# Altium PCB LSS-P-PCB-T v3.5.PcbDoc (part 5 of 5)
Units mil, origin at the board's own origin, x right, y up, seen from the top; angles counter-clockwise.
Board outline 2795.28 x 2795.28 mil, 4 copper layers (Top Layer, Power, Ground, Bottom Layer), stack 62.08 mil thick; 167 components, 123 nets, 589 pads, 650 vias.
Unrouted connection lines stored in the file: 2.
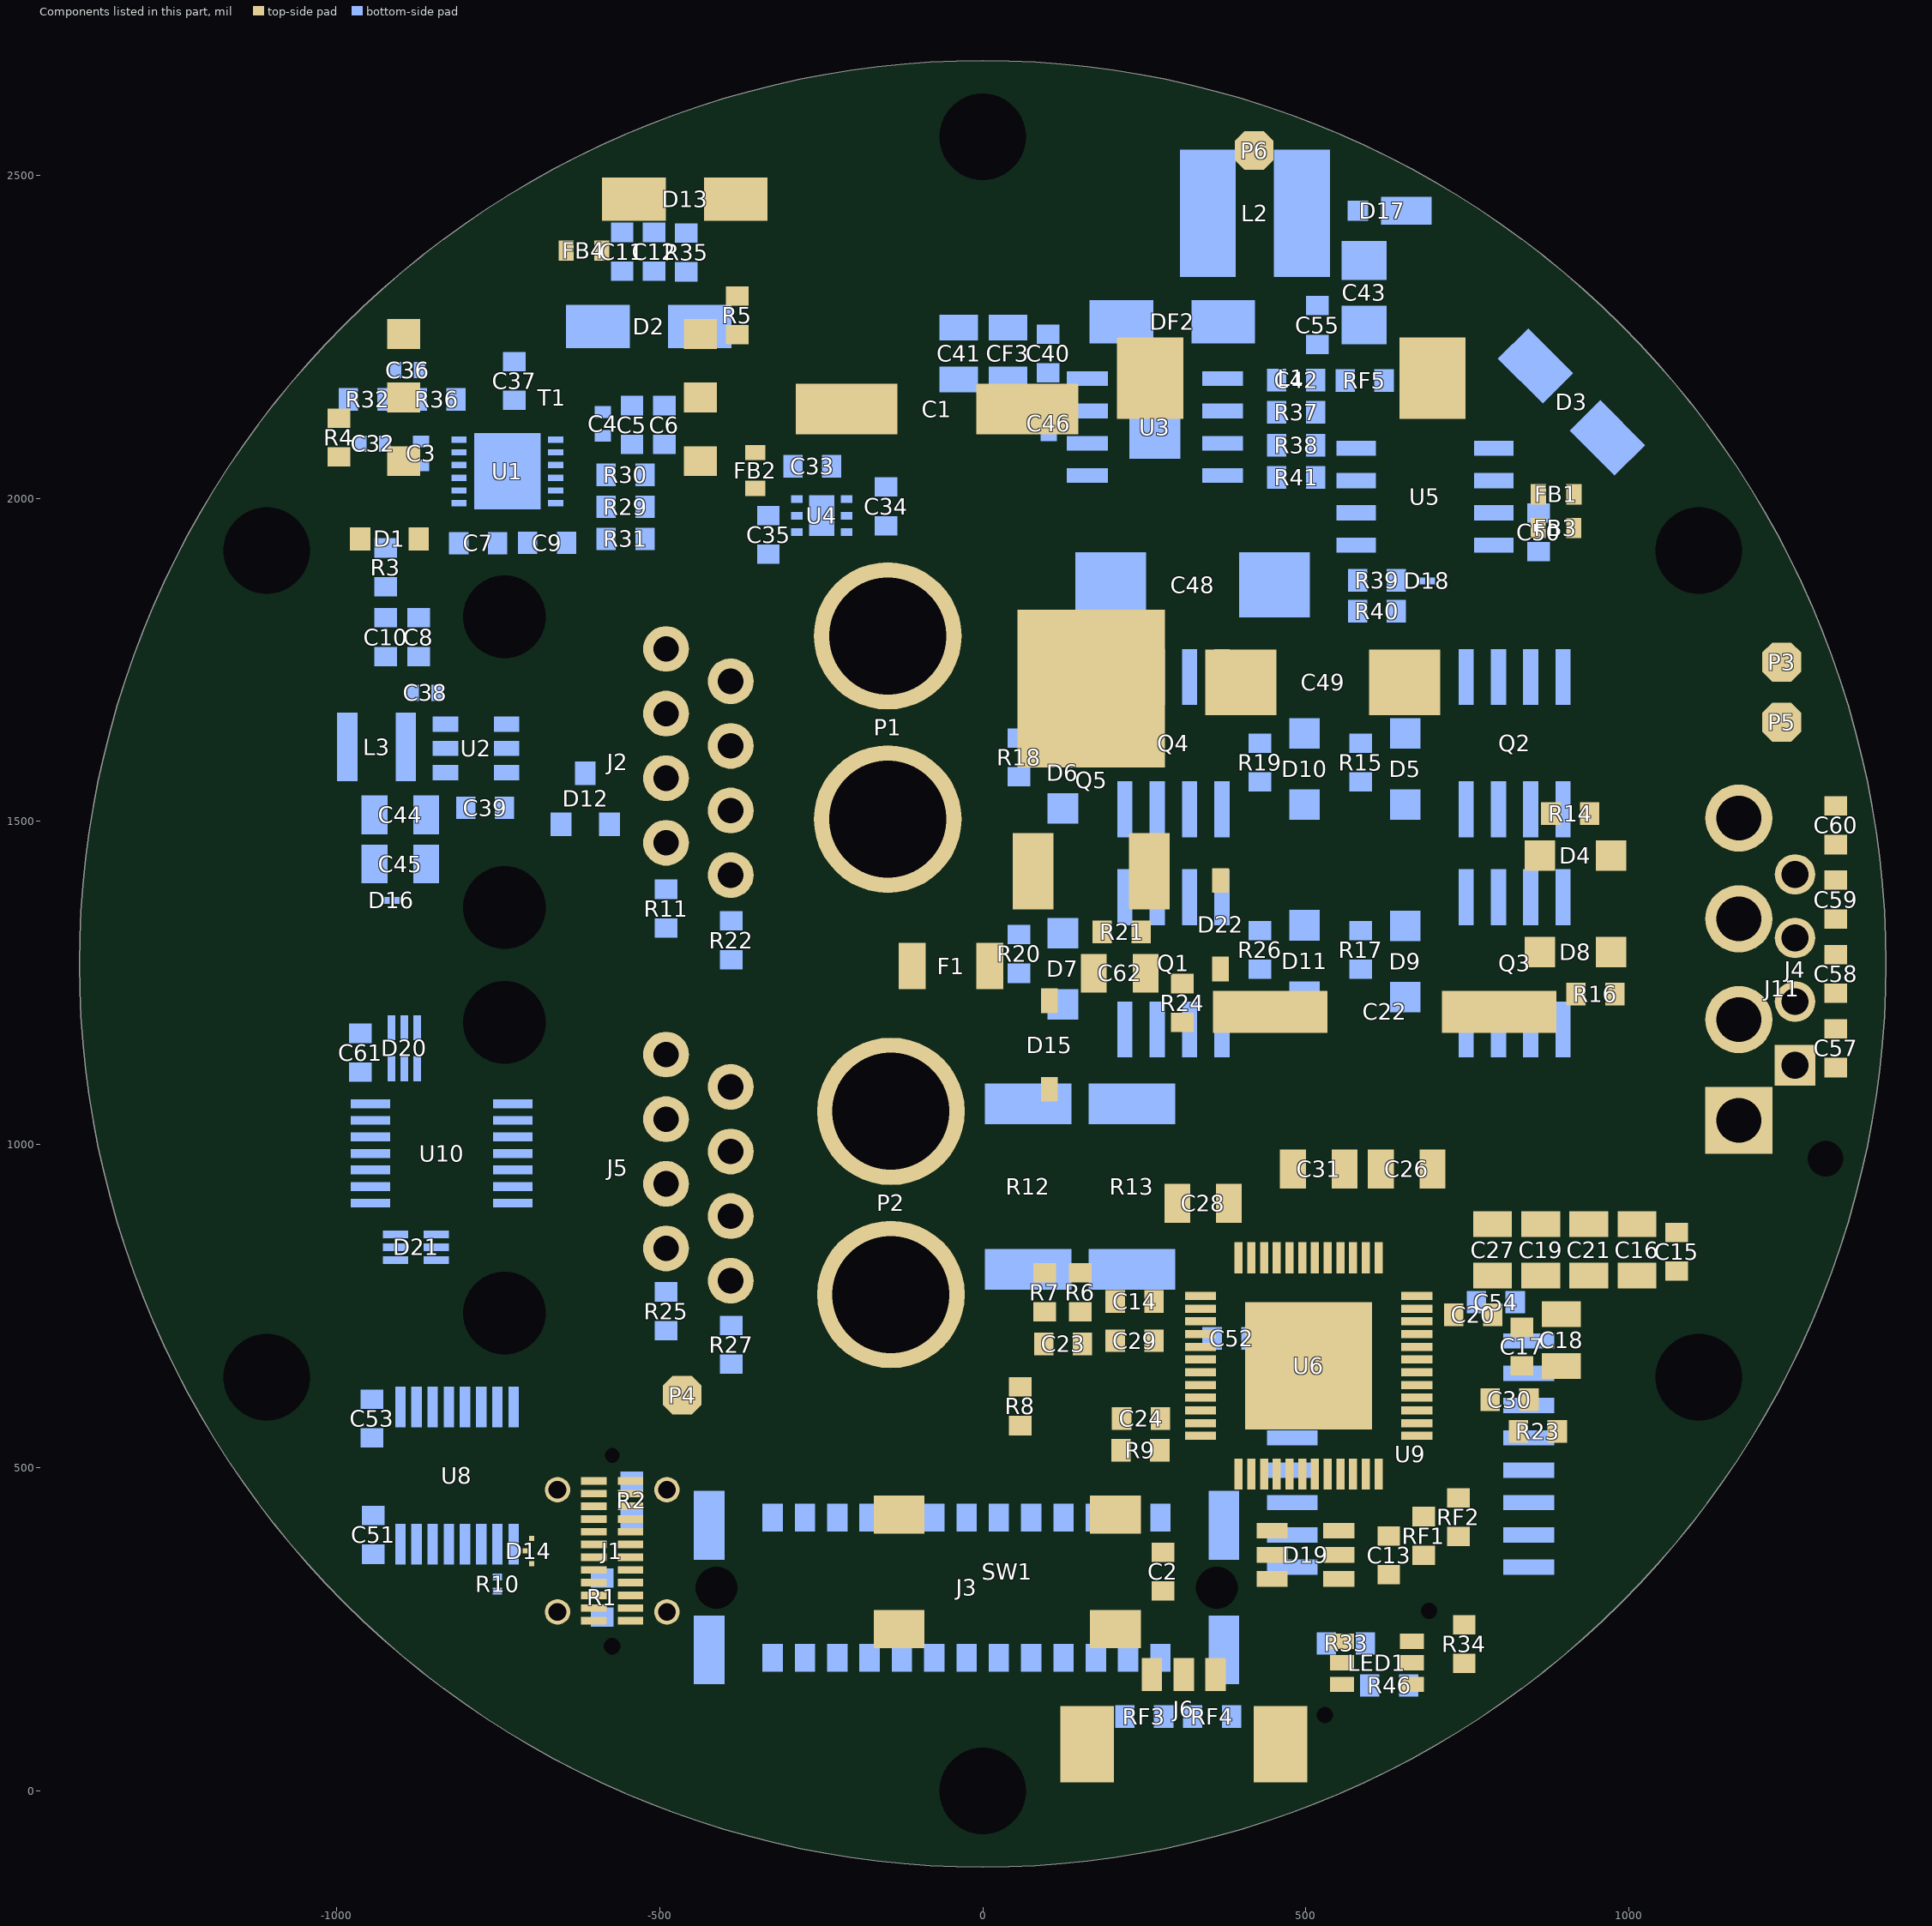
[diagram p5: the components of this part, seen from the top]

## Polygon pours and split planes (outlines as drawn)
GND on Bottom Layer "NONET_L-01_P-001" (solid, remove dead copper, pour order 6): -758,1077 -758,1054 -681,1054 -681,976 -644,976 -644,1077
GND on Bottom Layer "NONET_L-01_P-001" (solid, remove dead copper, pour order 2): 611.22,2496 685.23,2496 743,2459.31 743,2414.57 611.22,2415.47
VS### on Bottom Layer "NONET_L-01_P-001" (solid, remove dead copper, pour order 23): 26.62,1181 -1.97,1181 -33,1212.03 -33,1385.96 45.68,1464.64 180,1464.64 180,1367 32.97,1367 26.62,1360.65 26.62,1184
GND on Bottom Layer "GND_L04_P000" (solid, remove dead copper, pour order 0): -318,699.41 -243.35,626 -63.01,626 101.55,787 -318,787
12V on Bottom Layer "NONET_L-01_P-001" (solid, remove dead copper, pour order 3): 439,2570.78 530.85,2570.78 597,2541 597,2491.47 439,2491.47
VS### on Top Layer "NONET_L-01_P-001" (solid, remove dead copper, pour order 24): -10,1283 -10,1205 20,1175 138,1175 138,1282 137,1283 135,1283 137,1283 135,1283
VS### on Top Layer "NONET_L-01_P-001" (solid, remove dead copper, pour order 20): 223.41,1235 263,1235 263,1388.75 223.41,1388.75
GND on Top Layer "NONET_L-01_P-001" (solid, remove dead copper, pour order 18): 356.38,1204 356.38,1237.85 390.71,1237.85 390.71,1294.29 377,1308 324,1308 324,1437 430,1437 430,1325.25 467.25,1288 533.55,1288 533.55,1161.55 510,1138 356.5,1138 320.5,1174 290.5,1174 290.5,1204
VS on Top Layer "NONET_L-01_P-001" (solid, remove dead copper, pour order 13): 36,1634 36,1523 341,1523 341,1634
VS### on Top Layer "NONET_L-01_P-001" (solid, remove dead copper, pour order 15): 131,1481.62 131,1382.72 300,1382.72 300,1481.62
NetC62_1 on Top Layer "NONET_L-01_P-001" (solid, remove dead copper, pour order 16): 36,1340.5 118,1340.5 118,1481.72 36,1481.72
NetC62_1 on Top Layer "NONET_L-01_P-001" (solid, remove dead copper, pour order 12): 152,1211 209.84,1211 209.84,1327.14 152,1327.14
NetC62_1 on Top Layer "NONET_L-01_P-001" (solid, remove dead copper, pour order 14): 79,1371 79,1310 210,1310 210,1371
NetC62_1 on Top Layer "NONET_L-01_P-001" (solid, remove dead copper, pour order 10): 288,1291 288,1245 381,1245 381,1291
12V on Top Layer "NONET_L-01_P-001" (solid, remove dead copper, pour order 9): 461.22,2570.78 530.85,2570.78 599,2540.1 599,2481 461.22,2481
GND on Top Layer "NONET_L-01_P-001" (solid, remove dead copper, pour order 5): 614,2496 685.23,2496 743,2459.31 743,2415.45 614,2415.45
ISO_GND on Ground (split plane): 159 vertices, not listed, extent -949.93,109.07 1028.93,2481.39
GND on Ground (split plane): 101.37,2653.75 168.68,2647.12 235.58,2637.2 301.91,2624 367.52,2607.57 432.24,2587.94 495.92,2565.15 558.4,2539.27 619.54,2510.35 679.19,2478.47 737.2,2443.7 793.44,2406.12 847.76,2365.83 900.04,2322.93 950.16,2277.51 997.98,2229.68 1043.4,2179.57 1086.31,2127.29 1126.6,2072.97 1164.17,2016.73 1198.94,1958.72 1230.82,1899.07 1259.74,1837.93 1285.62,1775.45 1308.41,1711.77 1328.04,1647.05 1344.47,1581.44 1357.67,1515.11 1367.59,1448.2 1374.22,1380.9 1377.54,1313.34 1377.54,1279.53 1377.54,1245.71 1374.22,1178.16 1367.59,1110.85 1357.67,1043.95 1344.47,977.62 1328.04,912.01 1308.41,847.29 1285.62,783.61 1259.74,721.12 1230.82,659.98 1198.94,600.34 1164.17,542.33 1126.6,486.09 1086.31,431.77 1043.4,379.48 997.98,329.37 950.16,281.55 900.04,236.13 847.76,193.22 793.44,152.93 737.2,115.36 679.19,80.59 619.54,48.7 558.4,19.79 495.92,-6.1 432.24,-28.88 367.52,-48.51 301.91,-64.95 235.58,-78.14 168.68,-88.07 101.37,-94.69 33.82,-98.01 -33.82,-98.01 -101.37,-94.69 -168.68,-88.07 -235.58,-78.14 -301.91,-64.95 -367.52,-48.51 -432.24,-28.88 -495.92,-6.1 -558.4,19.79 -619.54,48.7 -679.19,80.59 -737.2,115.36 -793.44,152.93 -847.76,193.22 -900.04,236.13 -950.16,281.55 -997.98,329.37 -1043.4,379.48 -1086.31,431.77 -1126.6,486.09 -1164.17,542.33 -1198.94,600.34 -1230.82,659.98 -1259.74,721.12 -1285.62,783.61 -1308.41,847.29 -1328.04,912.01 -1344.47,977.62 -1357.67,1043.95 -1367.59,1110.85 -1374.22,1178.16 -1377.54,1245.71 -1377.54,1279.53 -1377.54,1313.34 -1374.22,1380.9 -1367.59,1448.2 -1357.67,1515.11 -1344.47,1581.44 -1328.04,1647.05 -1308.41,1711.77 -1285.62,1775.45 -1259.74,1837.93 -1230.82,1899.07 -1198.94,1958.72 -1164.17,2016.73 -1126.6,2072.97 -1086.31,2127.29 -1043.4,2179.57 -997.98,2229.68 -950.16,2277.51 -900.04,2322.93 -847.76,2365.83 -793.44,2406.12 -737.2,2443.7 -679.19,2478.47 -619.54,2510.35 -558.4,2539.27 -495.92,2565.15 -432.24,2587.94 -367.52,2607.57 -301.91,2624 -235.58,2637.2 -168.68,2647.12 -101.37,2653.75 -33.82,2657.07 33.82,2657.07
5V on Power (split plane): 179 vertices, not listed, extent -1377.54,141.07 -155.07,2648.46
VDD_3V3 on Power (split plane): -373.07,832.07 -522,832.07 -524.94,831.78 -527.77,830.93 -530.37,829.53 -532.66,827.66 -534.53,825.37 -535.93,822.77 -536.78,819.94 -537.07,817 -537.07,565 -537.07,447 -536.78,444.06 -535.93,441.23 -534.53,438.63 -532.66,436.34 -530.37,434.47 -527.77,433.07 -524.94,432.22 -522,431.93 516.93,431.93 516.93,343 517.22,340.06 518.07,337.23 519.47,334.63 521.34,332.34 564.16,289.52 566.45,287.64 569.05,286.25 571.88,285.39 574.82,285.1 701.52,285.1 704.13,284.86 954.35,285.74 950.16,281.55 900.04,236.13 847.76,193.22 793.44,152.93 737.2,115.36 679.19,80.59 619.54,48.7 558.4,19.79 495.92,-6.1 432.24,-28.88 426.07,-30.75 426.07,39 425.78,41.94 424.93,44.77 423.53,47.37 421.66,49.66 419.37,51.53 416.77,52.93 413.94,53.78 411,54.07 179.24,54.07 103.66,129.66 101.37,131.53 98.77,132.93 95.94,133.78 93,134.07 -172,134.07 -174.94,133.78 -177.77,132.93 -180.37,131.53 -182.66,129.66 -184.53,127.37 -185.93,124.77 -186.78,121.94 -187.07,119 -187.07,60 -187.07,-33.91 -186.78,-36.85 -185.93,-39.68 -184.53,-42.28 -182.66,-44.57 -180.37,-46.44 -177.77,-47.83 -174.94,-48.69 -172,-48.98 365.65,-48.98 301.91,-64.95 235.58,-78.14 168.68,-88.07 101.37,-94.69 33.82,-98.01 -33.82,-98.01 -101.37,-94.69 -168.68,-88.07 -235.58,-78.14 -301.91,-64.95 -367.52,-48.51 -432.24,-28.88 -495.92,-6.1 -558.4,19.79 -619.54,48.7 -679.19,80.59 -729.81,110.93 -322.76,110.93 -319.82,111.22 -316.99,112.07 -314.39,113.47 -312.1,115.34 -310.23,117.63 -308.83,120.23 -307.98,123.06 -307.69,126 -307.69,260 -307.98,262.94 -308.83,265.77 -310.23,268.37 -312.1,270.66 -314.39,272.53 -316.99,273.93 -319.82,274.78 -322.76,275.07 -756.76,275.07 -921.93,440.24 -921.93,975.7 -922.22,978.64 -923.07,981.47 -924.47,984.08 -926.34,986.36 -928.63,988.23 -931.23,989.63 -934.06,990.49 -937,990.77 -998.93,990.77 -998.93,1261.93 -611,1261.93 -608.06,1262.22 -605.23,1263.07 -602.63,1264.47 -600.34,1266.34 -598.47,1268.63 -597.07,1271.23 -596.22,1274.06 -595.93,1277 -595.93,1732.76 -524.52,1804.17 -522.64,1806.45 -521.25,1809.06 -520.39,1811.89 -520.1,1814.83 -520.1,1868.93 -373.07,1868.93
VCC_3V3_M on Power (split plane): 1164.17,2016.73 1198.94,1958.72 1230.82,1899.07 1259.74,1837.93 1285.62,1775.45 1308.41,1711.77 1328.04,1647.05 1344.47,1581.44 1357.67,1515.11 1367.59,1448.2 1374.22,1380.9 1377.54,1313.34 1377.54,1279.53 1377.54,1245.71 1374.22,1178.16 1367.59,1110.85 1357.67,1043.95 1344.47,977.62 1328.04,912.01 1308.41,847.29 1285.62,783.61 1259.74,721.12 1230.82,659.98 1198.94,600.34 1164.17,542.33 1126.6,486.09 1086.31,431.77 1043.4,379.48 997.98,329.37 984.6,315.99 774.64,315.25 581.07,315.25 547.07,349.24 547.07,447 546.78,449.94 545.93,452.77 544.53,455.37 542.66,457.66 540.37,459.53 537.77,460.93 534.94,461.78 532,462.07 -506.93,462.07 -506.93,549.93 -39.56,549.93 -36.62,550.22 -33.79,551.07 -31.18,552.47 -28.9,554.34 17.69,600.93 727.76,600.93 821.34,507.34 823.63,505.47 826.23,504.07 829.06,503.22 832,502.93 979.3,502.93 980.73,503.07 982.15,503.2 982.2,503.21 982.24,503.22 983.61,503.63 984.98,504.04 985.02,504.06 985.07,504.07 986.33,504.75 987.6,505.42 987.63,505.45 987.67,505.47 988.78,506.38 989.89,507.28 989.92,507.31 989.96,507.34 990.87,508.45 991.78,509.55 991.8,509.59 991.83,509.63 992.51,510.89 993.19,512.15 993.2,512.19 993.23,512.23 993.64,513.6 994.06,514.97 994.07,515.02 994.08,515.06 994.22,516.49 994.37,517.91 995.39,685.91 995.38,685.95 995.39,686 995.25,687.42 995.11,688.85 995.1,688.9 995.1,688.94 995.07,689.02 995.07,973.93 1063,973.93 1065.94,974.22 1068.77,975.07 1071.37,976.47 1073.66,978.34 1075.53,980.63 1076.93,983.23 1077.78,986.06 1078.07,989 1078.07,1106.93 1220.32,1106.93 1223.26,1107.22 1226.09,1108.07 1228.69,1109.47 1230.98,1111.34 1232.85,1113.63 1234.24,1116.23 1235.1,1119.06 1235.39,1122 1235.39,1548.68 1235.1,1551.62 1234.24,1554.45 1232.85,1557.06 1230.98,1559.34 1131.16,1659.16 1130.14,1660 1129.3,1661.02 1127.02,1662.89 1124.41,1664.28 1121.58,1665.14 1118.64,1665.43 1004.07,1665.43 1004.07,1738 1003.78,1740.94 1002.93,1743.77 1001.53,1746.37 999.66,1748.66 905.66,1842.66 783.67,1964.65 783.67,2058.93 1135.98,2058.93
3V3 on Power (split plane): -550.25,1821.07 -621.66,1749.66 -623.53,1747.37 -624.93,1744.77 -625.78,1741.94 -626.07,1739 -626.07,1292.07 -998.93,1292.07 -998.93,1698.29 -828.29,1868.93 -698,1868.93 -550.25,1868.93
3V8 on Power (split plane): -155.07,2067.07 -682.93,2067.07 -682.93,2331.76 -638.76,2375.93 -155.07,2375.93
VOUT_5V on Power (split plane): 830.63,675.34 832.91,673.47 835.52,672.07 838.34,671.22 841.29,670.93 965.15,670.93 964.32,533.07 838.24,533.07 744.66,626.66 742.37,628.53 739.77,629.93 736.94,630.78 734,631.07 11.44,631.07 8.5,630.78 5.68,629.93 3.07,628.53 0.79,626.66 -45.8,580.07 -506.93,580.07 -506.93,801.93 704.04,801.93
VCC_12V on Power (split plane): 105.93,1140.4 106.22,1137.46 107.07,1134.63 108.47,1132.03 110.34,1129.74 260.93,979.16 260.93,832.07 -3.93,832.07 -3.93,1072.6 -4.22,1075.54 -5.07,1078.37 -6.47,1080.98 -8.34,1083.26 -71.93,1146.85 -71.93,1275.9 -8.34,1339.49 -6.47,1341.77 -5.07,1344.38 -4.22,1347.2 -3.93,1350.14 -3.93,1799.08 -4.22,1802.02 -5.07,1804.85 -6.47,1807.46 -8.34,1809.74 -93.26,1894.66 -95.54,1896.53 -98.15,1897.93 -100.98,1898.78 -103.92,1899.07 -358,1899.07 -535.17,1899.07 -682.93,1899.07 -682.93,2036.93 105.93,2036.93
LED_R on Power (split plane): 162.34,28.34 164.63,26.47 167.23,25.07 170.06,24.22 173,23.93 395.93,23.93 395.93,-18.84 -156.93,-18.84 -156.93,60 -156.93,103.93 86.76,103.93
30VDC on Power (split plane): -34.07,1792.84 -34.07,1356.39 -97.66,1292.8 -99.53,1290.52 -100.93,1287.91 -101.78,1285.08 -102.07,1282.14 -102.07,1140.6 -101.78,1137.66 -100.93,1134.84 -99.53,1132.23 -97.66,1129.95 -34.07,1066.36 -34.07,832.07 -342.93,832.07 -342.93,1868.93 -110.16,1868.93
LED_B on Power (split plane): 304.34,250.34 306.63,248.47 309.23,247.07 312.06,246.22 315,245.93 499.93,245.93 499.93,206.07 -7.93,206.07 -7.93,296.93 257.76,296.93
VS on Power (split plane): 427.93,2074 428.22,2071.06 429.07,2068.23 430.47,2065.63 432.34,2063.34 434.63,2061.47 437.23,2060.07 440.06,2059.22 443,2058.93 753.52,2058.93 753.52,1958.41 753.81,1955.46 754.67,1952.64 756.06,1950.03 757.94,1947.75 884.34,1821.34 973.93,1731.76 973.93,1665.43 338.36,1665.43 335.42,1665.14 332.59,1664.28 329.98,1662.89 327.7,1661.02 239.34,1572.66 237.47,1570.37 236.07,1567.77 235.22,1564.94 234.93,1562 234.93,1231 235.22,1228.06 236.07,1225.23 237.47,1222.63 239.34,1220.34 316.34,1143.34 318.63,1141.47 321.23,1140.07 324.06,1139.22 327,1138.93 1047.93,1138.93 1047.93,1122 1048.22,1119.06 1048.69,1117.5 1048.22,1115.94 1047.93,1113 1047.93,1004.07 980,1004.07 977.06,1003.78 974.23,1002.93 971.63,1001.53 969.34,999.66 967.47,997.37 966.07,994.77 965.22,991.94 964.93,989 964.93,701.07 847.53,701.07 720.94,827.66 718.66,829.53 716.05,830.93 713.23,831.78 710.29,832.07 291.07,832.07 291.07,985.4 290.78,988.34 289.93,991.17 288.53,993.78 286.66,996.06 136.07,1146.64 136.07,2052 135.78,2054.94 134.93,2057.77 133.53,2060.37 131.66,2062.66 129.37,2064.53 126.77,2065.93 123.94,2066.78 121,2067.07 -124.93,2067.07 -124.93,2235.93 427.93,2235.93
MB2 on Power (split plane): 1047.93,1292.76 1047.93,1178.55 1047.93,1169.07 333.24,1169.07 265.07,1237.24 265.07,1416.93 923.76,1416.93
VOUT on Power (split plane): 101.37,2653.75 168.68,2647.12 235.58,2637.2 301.91,2624 367.52,2607.57 427.93,2589.24 427.93,2266.07 -124.93,2266.07 -124.93,2651.43 -101.37,2653.75 -33.82,2657.07 33.82,2657.07
MB1 on Power (split plane): 1205.25,1542.44 1205.25,1137.07 1078.07,1137.07 1078.07,1178.55 1078.07,1299 1077.78,1301.94 1076.93,1304.77 1075.53,1307.37 1073.66,1309.66 940.66,1442.66 938.37,1444.53 935.77,1445.93 932.94,1446.78 930,1447.07 265.07,1447.07 265.07,1555.76 344.6,1635.29 1112.4,1635.29
12V on Power (split plane): 495.92,2565.15 558.4,2539.27 619.54,2510.35 679.19,2478.47 737.2,2443.7 793.44,2406.12 847.76,2365.83 900.04,2322.93 950.16,2277.51 997.98,2229.68 1043.4,2179.57 1086.31,2127.29 1114.65,2089.07 458.07,2089.07 458.07,2578.69

## Other copper
Top Layer:
  rectangle net VS###: -10.71,1205 34,1311.83
  rectangle net ISO_GND: -718,363.93 -698,378.93
  region net VDD_3V3: -808,2349.8 -746.54,2306.76 -685.97,2393.26 -747.43,2436.3
  region net VDD_3V3: -747.43,2436.3 -713.51,2377.55 -610.32,2437.13 -644.24,2495.88
  region net VDD_3V3: -490.53,2496.46 -644.24,2496.46 -644.24,2419.11 -490.53,2419.11
  rectangle net VDD_3V3: -808,2199.74 -725,2349.8
  rectangle net 3V3_M: 789,1902 887.13,1977
  region net NetC62_1: 338,1211 338,1227 192,1227 192,1211
  rectangle net NetC62_1: 284,1220 338,1291
  rectangle net VS###: 224,1349 303,1482
  region net VS: 834,1202 834,1024 1050,1024 1050,1202
  rectangle net VS: 612,1150 873,1237.85
  rectangle net VS: 828,1024 879,1237.85
  region net VS: 612,1290 612,1205.37 814,1205.37 814,1290
  rectangle net ISO_GND: -463,2382 -269,2506
  region net VDD_3V3: -689.66,2450 -689.66,2367.25 -622.13,2367.25 -622.13,2450
  rectangle net 3V3: -606,2202 -544,2401.44
  region net VDD_3V3: -621.99,2411 -718,2411 -718,2364.5 -621.99,2364.5
  rectangle net ISO_GND: -628.86,473.09 -599.69,516.37
  region net ISO_GND: -596.51,268.91 -625.69,268.91 -625.69,225.63 -596.51,225.63
  region net ISO_GND: -517.82,268.91 -547,268.91 -547,225.63 -517.82,225.63
  rectangle net ISO_GND: -622,473 -525,491
  region net 3V3_M: 292,2045 292,1902 620,1902 620,2045
  region net VS: 650,1410 456,1410 456,1362 650,1362
  region net VS: 650,1150 650,1410 612,1410 612,1150
  region net VS: 582,1373 582,1565 456,1565 456,1373
  rectangle net GND: -318,698 -1,882.06
  rectangle net 30VDC: -318,915 -15.5,1133.5
  region net VS: 582,1639 272,1639 272,1523 582,1523
  region net 12V: 610,2100 610,2320 547,2320 547,2100
  rectangle net 12V: 540.74,2100 598,2416
  rectangle net NetD2_2: -530,2063 -408,2116
  rectangle net GND: 393.74,559.95 431,755.8
  region net NetD3_1: 833,2109 942.98,2218.98 894.05,2267.91 784.07,2157.93
  region net 12V: 1027.38,2092.64 1073.49,2134.15 998.68,2217.22 952.58,2175.71
  region net VS: 213.58,1787 213.58,2037 49.21,2037 49.21,1787
  region net 3V3_M: 455.37,1664 455.37,1785 293,1785 293,1664
  region net 3V3_M: 347.98,1664 347.98,2223.54 293,2223.54 293,1664
  region net VS: 182.66,1524.47 182.66,2103 36,2103 36,1524.47
  rectangle net NetD8_1: 895,1210 937,1270
  region net 12V: 599,2539 461,2539 461,2359 599,2359
  rectangle net VCC_12V: 245,721.3 320,732.3
  rectangle net HA2: 646,759.64 692,807
  rectangle net VS: 1030,772 1091.5,823
  rectangle net VOUT: 208,2308 346,2541
  rectangle net MOSI#: 527.09,315.39 586,341
  rectangle net TMC_1#: 656,409.37 699.79,442.61
  rectangle net GND: 593.74,466.03 631,757
  rectangle net TMC_2#: 707,419 753.79,471.37
  region net GND: 40,1157 40,1026.05 144,1026.05 144,1157
  rectangle net VCC_3V3_M: 660,325 753.79,402
  rectangle net VCC_3V3_M: 610.79,359 753.79,402.37
  rectangle net VCC_12V: 433,1842 963,1894
  rectangle net 3V3_M: 291.8,1984 362,2182.97
  rectangle net SW: -921.71,2030 -798,2125
  region net 30VDC: -59,1106 -59,1626 -318,1626 -318,1106
  region net VCC_3V3_M: 986,1902 986,1977 902,1977 902,1902
  region net VCC_12V: 1022,1709 1084.5,1771.5 962.5,1893.5 900,1831
  rectangle net VCC_12V: 245,722.3 285.31,761
  rectangle net MA2: 1062,1026 1109,1369
  rectangle net MB2: 1062,1376 1109,1573
  rectangle net SW: -834,2056 -798,2125
  rectangle net GND: -318,2090 -131,2292
  region net NetD2_2: -408.06,2034.23 -408.06,2106 -453.06,2106 -453.06,2034.23
  rectangle net VC: 453,2174 525.35,2256
  region net MA1: 1049,1585 826,1585 826,1550 1049,1550
  rectangle net GND: 832,850 1091,909
  region net VCC_3V3_M: 753.79,408.37 715.29,408.37 715.29,373 753.79,373
  rectangle net 3V3_M: 613.87,1902 821,1960
  region net 12V: 956.09,2025.93 1071.59,2133.64 1029.61,2178.66 914.11,2070.95
  region net 12V: 946.97,2080.6 1042.11,2166.27 997.62,2215.68 902.48,2130.01
  region net 12V: 974,1988.5 974,2130 902.44,2130 902.44,1988.5
  rectangle net VCC_12V: 789.26,1988 887,2089
  rectangle net MA1: 661,984 1221,1017
  region net ISO_GND: -463,2329 -463,2292 -362,2292 -362,2329
  region net ISO_GND: -463,2423 -463,2300 -418,2300 -418,2423
  region net HA2: 685,1641.75 685,1618.75 1166,1618.75 1166,1641.75
  rectangle net ISO_GND: 295,136 337,224.26
  rectangle net ISO_GND: -622,244 -525,269
  rectangle net GND: 308,515 362,575
  region net MA2: 767,1369 767,1336 1077.5,1336 1077.5,1369
  rectangle net SRAH: 525,1026 819,1078
  rectangle net MA1: 1262.79,1092 1347,1154
  rectangle net MB2: 1119,1434 1340,1484
  rectangle net MB1: 1154,1319 1340,1369
  rectangle net MA2: 1077,1142 1192,1263
  rectangle net MA2: 1106,1202 1345,1263
  region net MB2: 710.81,1415 710.81,1376 1107,1376 1107,1415
  rectangle net 3V3_M: 340,2170 421,2293
  rectangle net HA2: 598,1572 735,1642
  rectangle net BUTTON: 57,221 244,265
  rectangle net BUTTON: 164.95,250.78 244.69,297.78
  rectangle net MB2: 669,1299 772,1329
  rectangle net LA1: 946,1210 1050,1326
  region net NetD8_1: 831,1326 831,1247 937,1247 937,1326
  rectangle net HA1: 916,1423 1048,1480
  region net HA1: 1048,1540 913,1540 913,1422 1048,1422
  rectangle net NetD4_1: 826,1422 900,1540
  rectangle net GND: -740,2105 -600.21,2181
  rectangle net VCC_12V: -506,2012 -472,2047
  rectangle net VCC##: -971,1954 -930,2195
  rectangle net NetR32_1: -922,2228 -825,2283
  rectangle net VCC#: -909,1904.01 -803,2020.18
  rectangle net VCC_12V: 868,1862 938,1887
  rectangle net VCC#: -909,1904 -838,1969
  region net VCC_12V: 993,1709 1031,1747 890,1888 852,1850
  region net VCC_12V: 1269,1786 992.5,1786 992.5,1709 1269,1709
  region net GND: 939,583.05 939,634.05 828.45,634.05 828.45,583.05
  rectangle net GND: 864,584 939,680
  region net MA1: 749,1611 749,1571 1049,1571 1049,1611
  region net VCC##: -918.15,1787 -918.15,1994 -981,1994 -981,1787
  rectangle net 3V8: -355,2058.75 -329,2353
  rectangle net 3V8: -389,2055 -329,2191
  rectangle net NetD2_2: -530,2065 -471,2315
  rectangle net 30VDC: -268,1424 11,1626
  rectangle net 12V: 515,2100 595,2159
  rectangle net 12V: 439,2267 598,2372
  region net NetD3_1: 761.4,2073.22 908.94,2220.76 817.89,2311.82 670.35,2164.27
  region net NetD3_1: 841.5,2357.5 794.61,2310.61 914.61,2190.61 961.5,2237.5
  rectangle net NetD3_1: 637,1969 768,2248.99
  rectangle net 12V: 589,2318 709,2403
  region net 12V: 439,2482 439,2318 598,2318 598,2482
  region net VOUT: 423,2308 423,2482 242,2482 242,2308
  rectangle net 3V3_M: 207.81,2123.01 348,2293
  rectangle net VS: -50,2045 182.66,2267
  rectangle net VCC_12V: -506,1912 -423,2021
  rectangle net VS: 83,1637 181,1767
  rectangle net VS: -50,1984 143,2082
  rectangle net 3V8: -697,2202 -629,2348.84
  rectangle net BH: 189,556.83 237,614.67
  rectangle net GND: 186,662 221,778
  rectangle net VS: 860,713.37 959,815
  rectangle net VS: 774,741 872.41,768
  rectangle net VS: 833,742 866.83,802
  rectangle net BL: 257,509 292,594
  rectangle net VOUT_5V: 250,680 305,713
  rectangle net SPI_CS#: 376,466.03 402,514.06
  rectangle net NetLED1_5: 643,185 763,210
  rectangle net BUTTON: 165,290 296.5,326
  rectangle net BH: 34.29,602 82.29,647
  rectangle net 3V8: -409,2337 -329,2369
  rectangle net NetR5_2: -463,2214.82 -362,2282
  rectangle net VCC_3V8: -383,1941.47 -159,2035
  rectangle net GND: 598,1649.37 845,1834
  rectangle net VS: 833,765 1091.5,823
  rectangle net VCC_12V: 358,1796 462,1894
  rectangle net VS: 474,1558 582,1834
  rectangle net VS: 857,1650 918,1765
  rectangle net HB1: 301.29,759.37 363.29,824
  rectangle net VCC_12V: 312.29,700.37 362.29,732.37
  rectangle net MA1: 661,932 729,1015
  rectangle net NetC31_2: 515.29,926.37 581,994.37
  rectangle net MA2: 606.29,799.37 626,849.37
  rectangle net AL: 127.29,671.37 173.29,758.37
  rectangle net AH: 76.29,671.37 113.29,758.37
  region net GND: 0,699.24 -63.95,630 -248,630 -317.24,699.24
  region net 30VDC: -206,1316 -64.4,1316 11,1384.55 11,1497.82
  region net GND: 11,1658 11,1900.86 -318,1900.86 -318,1658
  region net 30VDC: -23,1074.82 -15.5,1133.5 -76.82,1194.82 -152,1194.82
  region net GND: -638,2166 -638,1971 -740,1971 -740,2166
  region net ISO_GND: 163.95,354 163.95,457.18 247.25,457.18 298,406.43 298,354
  region net NetD3_1: 841,2357 841,2320.16 727.5,2213.82 727.5,2357
  region net NetD9_1: 585,1141 776,1141 776,1087 585,1087
  region net SRAH: 525,1078 542,1095 574,1095 574,1067.59
  region net VS: 914,1754 917.5,1764.5 970,1712 970,1650 898.85,1650
  region net MB2: 1186.03,1443 1246.03,1383 1288,1383 1294,1383 1294,1385 1294,1443
  region net MA1: 1221,984 1347,1092 1347,1125 1118,1125 1118,984
  region net MA2: 1192,1141.1 1283,1217 1279.55,1260.1 1094,1260.1 1094,1141.1
  region net MB2: 1196,1572.91 1340,1434 1101,1434 1101,1572.91
  region net MB1: 1196,1417 1292,1321 1292,1279.53 1118,1279.53 1118,1417
  region net MA2: 815,1561 815,1424 600,1424 600,1561
  region net MB2: 755,1415 755,1358 755,1302 670,1302 670,1415
  region net VC: 494,2063 374,2063 374,2128 494,2128
  region net VC: 494,2256 494,2072 439,2072 439,2256
  region net GND: -49,2319 168,2319 168,2284 -49,2284
  region net GND: 632,2308 708,2308 708,2260 632,2260
Bottom Layer:
  rectangle net ISO_GND: -703,2377.19 -298,2439
  region net ISO_GND: -705.04,2447.96 -670.8,2388.66 -567.4,2448.36 -601.63,2507.66
  region net ISO_GND: -779,2374 -734.5,2329.5 -660.54,2403.46 -705.04,2447.96
  region net 3V3_M: 626.69,1890 626.69,1851 682.32,1851 682.32,1890
  region net GND: 519,1137 519,1181 409,1181 409,1137
  rectangle net ISO_GND: -601.63,2377.19 -269,2507.66
  region net ISO_GND: -598.51,518.37 -627.69,518.37 -627.69,463 -598.51,463
  region net ISO_GND: -525.5,463 -525.5,492 -624,492 -624,463
  region net ISO_GND: -455,497.18 -455,468 -397.09,468 -397.09,497.18
  region net ISO_GND: -524,284 -548,284 -548,212 -524,212
  region net ISO_GND: -524,248 -524,284 -606.5,284 -606.5,248
  rectangle net ISO_GND: -628.86,225.63 -599.69,284
  rectangle net NetD9_1: 558,1107 709,1291
  rectangle net 3V3: -1002,1366 -953,1669
  rectangle net GND: -42.86,1784 178,1886
  region net GND: -960.5,469 -960.5,409 -922,409 -922,469
  region net 30VDC: -28.46,1134 -277,1134 -277,917 -28.46,917
  region net NetD6_1: 76,1481.72 76,1587 32.63,1587 32.63,1481.72
  region net VS###: 91,1181 91,1242 -1,1242 -1,1181
  region net NetD7_1: 174.35,1184 174.35,1262 100.41,1262 100.41,1184
  region net 5V: -64,1934.76 -64,2022.26 -112.02,2022.26 -112.02,1934.76
  rectangle net GND: -356,2113 -227,2297
  rectangle net VCC#: -827,1945 -794.5,1998
  region net GND: 535.29,2099.97 496,2099.97 496,2061 535.29,2061
  rectangle net ISO_GND: -268.71,1934.96 -229,2066.96
  region net ISO_GND: -203,1992.34 -203,2033 -234.52,2033 -234.52,1992.34
  rectangle net ISO_GND: -231,2004 -132.21,2067
  region net 30VDC: -88.29,1628 -318,1628 -318,917 -88.29,917
  rectangle net 30VDC: -271,1452.91 -32.18,1628
  rectangle net GND: 617,1780 883,1843
  rectangle net CII: 541,1782 609,1944
  rectangle net GND: -244.19,1784 280,1914
  rectangle net MB2: 208,1293 294,1449
  region net GND: 84,1678 84,1792 -52.51,1792 -52.51,1678
  region net GND: -787,2181 -787,2113.37 -289,2113.37 -289,2181
  rectangle net 5V: -166,1935 -64,1980.37
  rectangle net 5V: -219.71,1935 -132.21,1959
  rectangle net GND: -72,2238 288.5,2313
  rectangle net GND: -318,717 30,891
  rectangle net VDD_3V3: 803.96,680 849,776
  region net ISO_GND: 276,464.11 201.4,464.11 201.4,363 276,363
  rectangle net MOSI#: 439.56,526 518.3,557.81
  rectangle net BOOT1: 247,64.26 272,89
  region net GND: 523.14,334.19 523.14,376 435,376 435,334.19
  rectangle net DIAG0_SWN#: 439.56,384 523.14,412
  region net DRV_ENN#: -825.82,827.22 -867.71,827.22 -867.71,814 -825.82,814
  region net ISO_GND: -919.15,500.01 -919.15,563.01 -963,563.01 -963,500.01
  rectangle net 5V: -386,181 -309.25,243
  rectangle net ISO_GND: -735.07,562.5 -717.93,625.5
  rectangle net DRV_DIR###: -979,894 -889.2,916.27
  rectangle net DRV_DIR###: -928,854.78 -889.2,916.27
  region net GND: -940.32,1157 -940.32,1220 -983,1220 -983,1157
  region net VCC_3V3_M: -940.32,1052.09 -940.32,1128 -983,1128 -983,1052.09
  rectangle net VDD_3V3: -963,586.91 -892.93,626
  rectangle net VCC_3V3_M: -763.28,274 -738,314.49
  rectangle net VCC_3V3_M: -961.5,349.91 -893.93,381
  region net GND: 138,1104 138,1162 42,1162 42,1104
  region net SRBH: 297.79,965 297.79,1101.45 253,1101.45 253,965
  region net NetD7_1: 178,1128 178,1268 146,1268 146,1128
  rectangle net ISO_GND: 208,401 397,464
  region net GND: 691.68,1905.4 691.68,1825 883,1825 883,1905.4
  region net 3V3_M: 665.25,1944.51 617,1944.51 617,1851 665.25,1851
  rectangle net ISO_GND: -910,1367 -829,1547
  rectangle net 12V: 441,2320 708,2398
  region net VCC_12V: 949.5,1783 949.5,2025.5 895,2025.5 895,1783
  rectangle net VCC_12V: 301,1781 526,1957
  rectangle net 3V3: -787,1638.59 -717.07,1694
  rectangle net GND: 549,2216 707,2308
  rectangle net GND: 227.16,2028 305.16,2103
  rectangle net VCC##: -906.5,1795 -828,1884
  rectangle net 3V3: -968,1366 -921,1547
  rectangle net ISO_GND: -448,163 -400,271
  region net NetC38_2: -811,1712 -854,1712 -854,1638 -811,1638
  region net ISO_GND: -780,1590 -853,1590 -853,1503 -780,1503
  region net VCC_3V8: -714,1625 -758,1625 -758,1502 -714,1502
  region net NetC38_1: -807,1598 -807,1628 -910,1628 -910,1598
  rectangle net NetC38_1: -919,1556.85 -869,1711.5
  region net ISO_GND: 997,785.27 997,821 739,821 739,785.27
  region net VCC_12V: 618,1998.71 438,1998.71 438,1954 618,1954
  rectangle net 12V: 439,2320 597,2541
  rectangle net NetR32_1: -953,2228 -900,2269
  rectangle net NetR32_1: -939,2228 -825,2283
  rectangle net NetR32_1: -996.74,2136.16 -973.88,2225
  rectangle net VCC##: -953,2135 -898,2211
  region net NetR32_1: -915.5,2259.5 -939,2283 -997,2225 -973.5,2201.5
  rectangle net NetR32_1: -989,2135.16 -966.14,2231
  rectangle net VCC##: -939,2135 -898,2209
  rectangle net NetC32_1: -975,2071 -952.27,2110
  rectangle net FB_ISO: -945,1908 -908,2097
  region net NetC32_1: -975,2128 -975,2105 -852,2105 -852,2128
  region net FB: 410.36,2154 410.36,1989 430.36,1989 430.36,2154
  region net VCC_12V: 908.1,1986.1 936,2014 875,2075 847.1,2047.1
  rectangle net GND: -979,951 -879,970
  rectangle net LA1: 943.93,1231 976,1311.44
  region net MA2: 1110,945 1110,1059 1079,1059 1079,945
  rectangle net VS: 61,2166 206,2204
  rectangle net LED_B: 8,184 42,259.58
  rectangle net SPI_CS#: 441,629 526,658
  rectangle net ISO_GND: 738.99,726.22 789,815
  region net LED_G: -259,444 -293,444 -293,344.5 -259,344.5
  rectangle net VDD_3V3: 279,65 341,134.23
  region net TMC_2: 141.5,227.98 107.5,227.98 107.5,156 141.5,156
  region net TMC_1: 192,227.98 158,227.98 158,156 192,156
  rectangle net BUTTON: 58,183 92,258
  region net LED_R: -258,228.98 -292,228.98 -292,157 -258,157
  rectangle net USB_DM: -241,184 -207,259
  region net BOOT0: 404,43 404,134 348.19,134 348.19,43
  region net BOOT1: 258,64.26 258,133 204,133 204,64.26
  rectangle net BOOT0: 367,95 404,134
  rectangle net BOOT1: 204,67 241,228
  rectangle net VDD_3V3: 265,97.5 341,134
  rectangle net NetLED1_4: 644,146 718,180
  rectangle net USB_DP: -200,184 -158,259
  rectangle net GND: 336,653 371,717.62
  rectangle net VCC_3V3_M: 399,682 526,718
  region net SRBH: 294,963 294,1094.45 156,1094.45 156,963
  rectangle net MA2: 1226,1192 1298,1272.57
  rectangle net MB1: 1226,1286 1298,1371
  rectangle net MA1: 919,1575 1169,1638
  rectangle net GND: 0,833 145,891
  rectangle net GND: -102,773 305,852
  rectangle net MA1: 885,1419 933,1627
  rectangle net NetD9_1: 736,1088 764,1241
  region net NetD8_1: 933,1250 933,1294 835,1294 835,1250
  rectangle net LA1: 961,1231 1048,1328
  region net SRAH: 933,1090 933,1119 795,1119 795,1090
  region net NetD5_1: 762,1469 762,1562 599,1562 599,1469
  rectangle net NetD10_1: 208,1457 244,1590
  rectangle net NetD8_1: 835,1126.43 879,1288
  rectangle net HA1: 946,1337 1048,1507
  rectangle net MA1: 916,1620 1169,1663
  rectangle net GND: -786.71,2113.37 -467,2167
  region net 12V: 1075.61,2134.61 995.61,2214.61 958.61,2177.61 1038.61,2097.61
  region net SRAH: 137.21,993 137.21,1095 3.36,1095 3.36,993
  rectangle net SRBH: 253,1032 288,1230
  rectangle net SRAH: 307,1040 568,1092
  region net NetD11_1: 433,1237 433,1274 209,1274 209,1237
  rectangle net VS: 863,715 959,776
  region net VDD_3V3: 949.93,670 949.93,708 803.7,708 803.7,670
  rectangle net VS: 942,1070 1046,1117
  rectangle net SW: -831.71,2068 -798.71,2171
  rectangle net VDD_3V3: 580,108 623,181
  rectangle net VS: -67,2178 220,2225
  region net VCC_12V: 918.5,1994.5 949.5,2025.5 888,2087 857,2056
  rectangle net VCC_3V3_M: 1188,1610 1288,1702
  rectangle net VS: 107,1678 969,1767
  rectangle net NetD9_1: 581,1092 712,1293
  rectangle net SRAH: 886,1090 933,1237
  rectangle net NetD4_1: 832,1435 876,1564
  rectangle net NetD6_1: 306,1443 342,1563
  region net GND: 130.31,2047 130.31,2006 283,2006 283,2047
  rectangle net GND: 600,2107 706,2218
  rectangle net NetD11_1: 208,1135 244,1274
  rectangle net VCC##: -977,1795 -899,1884
  rectangle net SRAH: 788,1090 825,1241
  rectangle net NetC50_2: 755,1954 883,1997
  rectangle net NetD3_1: 736,2005 823,2051
  rectangle net NetC32_1: -890,2108.64 -852,2211
  rectangle net NetD2_2: -529,2218 -373.83,2315
  region net GND: 1073,2053 953,2173 884.51,2104.51 1004.51,1984.51
  rectangle net VCC_3V8: -348,2002 -277,2066.87
  rectangle net VCC_3V8: -307.71,1992.65 -277,2066.87
  region net GND: 605,2261 496,2261 496,2213 605,2213
  rectangle net VC: 439,2162 477,2261
  rectangle net 12V: 496,2107 590,2157
  rectangle net 12V: 450,2477 597,2541
  rectangle net VOUT: 219,2321 332,2543
  rectangle net FB: 339,1989 429,2052
  rectangle net VS: 201,2059 220,2219.55
  rectangle net VS: 125,2057 220,2107
  rectangle net VS: -52,1984 79,2197
  rectangle net NetLED1_6: 578,190 607,245
  rectangle net NetC46_1: 86,2116 194,2153
  rectangle net MA1: 730,1577 933,1663
  rectangle net ISO_GND: -548,212 -439,248
  rectangle net NetJ1_A5: -655,313 -569,344
  rectangle net ISO_GND: -455,355 -397,488
  rectangle net NetC9_2: -661,1905 -628.94,1949
  rectangle net 3V8: -558,2325 -355,2368
  rectangle net GND: 227,2152 289,2309
  rectangle net GND: 339,2123 403,2165
  rectangle net VC: 339,2073 403,2115
  rectangle net 12V: 439,2271 539,2326
  rectangle net GND: 600,2165 638,2308
  rectangle net NetC42_2: 496,2164 590,2204
  rectangle net "IPK SNS": 546,2027.37 619,2096.37
  rectangle net "IPK SNS": 497,2013 619,2050
  rectangle net FB: 412,2061 478,2154
  region net VCC_12V: 480,1915.37 480,2051 438,2051 438,1915.37
  rectangle net VOUT: 300,2173 421.17,2543
  rectangle net 3V8: -683,2216 -546.27,2368
  rectangle net NetD7_1: 295,1133 339,1228
  rectangle net SRBH: 347,1099 399,1228
  rectangle net MB2: 253,1419 294,1562
  rectangle net MB1: 309,1286 393,1429
  rectangle net MB1: 352,1400 393,1563
  rectangle net NetD5_1: 554,1423 607,1589
  rectangle net NetD5_1: 554,1412 711,1555
  rectangle net HA2: 618,1581 716,1662.96
  rectangle net MA2: 719,1339 824,1458
  rectangle net MA2: 775,1419 824,1562
  rectangle net MA1: 834,1339 933,1426
  rectangle net LA2: 558,1301.96 711,1399
  rectangle net LB2: 403,1296 532,1385
  rectangle net LB1: 36,1301.96 179,1358
  rectangle net HB1: -1,1599 178,1663
  rectangle net NetD11_1: 409,1188 531,1288
  rectangle net HB2: 188,1602.96 543,1662.96
  rectangle net HA2: 554,1602.96 712,1662.96
  rectangle net NetD10_1: 405,1416 543,1590
  rectangle net NetD6_1: 33,1481.72 180,1586.37
  rectangle net NetD7_1: 33,1250 178,1286
  rectangle net ISO_GND: 259,145 400,229
  rectangle net GND: -556,2018 -508,2054
  region net NetD3_1: 961.5,2237.5 846,2353 716.5,2223.5 832,2108
  rectangle net SW: -882.29,2068 -799,2097
  rectangle net NetD3_1: 635,1954 745,2051
  rectangle net ISO_GND: 346,163 400,272
  rectangle net GND: -786.71,1905 -683.71,2005
  rectangle net GND: -786.71,2064 -646.71,2151
  rectangle net ISO_GND: -779,2196.37 -704.71,2374
  rectangle net VCC#: -897,1905 -794.22,1963.5
  rectangle net VCC_12V: -499.71,1898 -445,2082.37
  rectangle net VCC_12V: -552.71,1898 -454,2010
  rectangle net NetC9_2: -675.71,1905 -645.71,1998
  rectangle net NetR31_1: -608,1898 -566,1961
  rectangle net NetR29_1: -612.71,1970 -567,2054
  rectangle net VCC_12V: -629.71,2064.37 -445,2106.37
  rectangle net GND: 673,1898 883,1944
  rectangle net "IPK SNS": 546,2059.37 823,2099
  rectangle net VCC_12V: -17,1927 468.29,1965
  region net VCC_12V: 888,2087 832,2087 832,2005 890,2005 cw(c891.48,2008.83) 888,2011
  region net 30VDC: -29,1065.57 -29,1136 -107.02,1214.02 -156.32,1203.36
  region net 30VDC: -32.18,1452.91 -72.22,1456.78 -100.54,1428.46 -93.99,1398.2
  region net GND: 229,2006.45 283.55,2006.45 306,2028.91 306,2071.27
  region net GND: -318,1659 -33,1659 -33,1833.42 -318,1833.42
  region net GND: -125.4,1885.14 -23,1885.14 -23,1830.53
  region net GND: -318.29,1833.71 -248.2,1914 143.08,1914 68,1811.18
  region net VCC_3V3_M: -983,1085 -891,1085 -891,1062 -901,1052 -983,1052 -983,1081
  region net ISO_GND: -885,1547 -780.12,1547 -780.12,1456 -831.83,1385.65 -885,1400
  region net VCC_12V: 1021,1836 942,1915 895,1915 895,1782.85 1021,1782.85
  region net VS: 1046,1082 1046,1018 789,1018 789,1082
  region net 30VDC: -271,1466.56 -271,1389 -91.79,1389 -83,1431.77
  region net MA2: 1290,1232 1181.68,1139 1090,1139 1090,1272.1 1290,1272.1
  region net MA1: 1202,1128 1253,1179 1318,1179 1318,1123 1179,984 1118,984 1118,1128
  region net MA1: 1118,1118.51 1118,984 1235,984 1235,1118.51
  region net MB1: 1290,1330 1191,1429 1089,1429 1089,1286 1290,1286
  region net MB2: 1249,1446 1249,1568 1056,1568 1056,1446
Power (plane layer: these items are gaps in the copper):
  lines w5: -937,434 -877.55,374.55
  lines w10: -1017,1276 -1016,1277 ; -148,2672 -140,2664
  lines w30: -1018,1277 -611,1277 -611,1739 -535.17,1814.83 -535.17,1884 ; -1014,1262.53 -1014,1704.53 -834.53,1884 -103.92,1884 -19,1799.08 -19,1350.14 -87,1282.14 -87,1140.6 -19,1072.6 -19,818 ; -1014,1277 -1014,975.7 -937,975.7 -937,434 -763,260 -322.76,260 -322.76,126 -781.12,126 ; -698,1884 -698,2338 -645,2391 -141,2391 ; -695,2052 121,2052 121,1140.4 276,985.4 276,828 ; -449.91,565 -39.56,565 11.44,616 309,616 734,616 832,518 979.3,518 980.31,686 841.29,686 710.29,817 362,817 -522,817 -522,565 ; -407,565 -522,565 ; -358,1884 -358,817 -335,817 ; -140,2052 -140,2664 ; -135,2251 441,2251 ; 146,2673 156,2673 ; 368.1,447 532,447 532,343 574.82,300.18 774.67,300.18 ; 376.89,447 -259,447 -522,447 -522,565 ; 443,2602 443,2074 1147.56,2074 ; 704.08,299.93 1003.98,300.98 ; 768.59,2074 768.59,1958.41 895,1832 989,1738 989,1658.36 997,1650.36 ; 979.42,685.14 980,685.73 ; 980,685.43 980,989 1063,989 1063,1113 ; 1063,1178.55 1063,1122 1220.32,1122 1220.32,1548.68 1120.5,1648.5 ; 1118.64,1650.36 338.36,1650.36 250,1562 250,1231 327,1154 1063,1154 1063,1299 930,1432 253,1432 ; 253,1432 253,1432 ; -172,-33.91 411,-33.91 411,39 173,39 93,119 -172,119 -172,60 -172,-33.91 ; -23,194.01 -23,312 264,312 315,261 515,261 515,191 262,191 -19.99,191 -23,194.01
Ground (plane layer: these items are gaps in the copper):
  lines w30: -618,142 -753,277 -753,477 -965,477 -965,847.05 -598,847.05 -598,1274 -895,1274 -895,1616 -698,1616 -572,1742 -572,1893.8 -433,1893.8 -433,2098.63 -233,2098.63 -233,2306 -487.36,2306 -487.36,2496.46 -106,2496.46 -106,1922 -291,1922 -291,1181 ; -616,144 65.22,144 115.22,94 491,94 491,166 770.01,166 782,166 968,352 1044,428 1044,517 877,517 639,279 424,279 424,488 -288,488 -291,864 -291,1182

## Silkscreen, mask and mechanical layers (free items; w line width, h text height)
Top Overlay:
  lines w8: 279.55,1163.44 287,1171
  text "GND" at 247,2508 h60
  text "LSS-P-PCB-T v3.5" at -357,2352.88 h75
  text "12V" at 1036,1720 h60
  text "3V3_M" at 1035.47,1624 h55
  text "CAN_IN" at -1190.8,1603.57 h75
  text "For R_SW" at -1280,1349 h55 r90
  text "#" at 282,954 h45
  text "#" at 775,909 h45
  text "#" at 855,908 h45
  text "#" at 929,908 h45
  text "#" at 1006,908 h45
  text "CAN_OUT" at -1271,896 h75
  text "*" at 1059,883 h45
  text "#" at 690,874 h45
  text "#" at 549,873 h45
  text "*" at 710,757 h45
  text "#" at 939,637 h45
  text "5V" at -427,586 h60
  text "*" at 615.79,413.37 h45
  text "*" at 265,389 h45
  text "BOOT_1" at 269,209 h18 r90
  text "I_GND" at 319,209 h18 r90
  text "BOOT_0" at 368,209 h18 r90
Bottom Overlay:
  lines w7: -854,1112 -841,1099 -665,1099 ; -853,1296.5 -836.5,1296.5 -824,1309 -824,1390 -831,1397 ; -587.29,2152 -587.29,2162 ; 534,2204 543,2213 702,2213 721,2232 721,2282 ; 544.47,2225.09 682.09,2225.09 697,2240 697,2325 705,2333 ; 635.47,2401.09 698,2401.09
  lines w8: -1057.82,1577.14 -1024.12,1542.95 -972.19,1542.57 ; -1002,2113 -897.5,2113 -888.79,2104.29 ; 421,2017 421,2069 429.5,2077.5
  text "*" at 741,2330 h45
  text "*" at 118,2307 h45
  text "*" at -940,2069 h45 r180
  text "*" at -939,1686 h45 r270
  text "*" at -984,1191 h45 r90
  text "*" at 841,778 h45
  text "*" at 367,721 h45
  text "*" at -1005,566 h45 r180
  text "*" at -974,340.49 h45
Board Outline:
  lines w15: -1210.39,580.71 cw(c0,1279.53) -1210.39,1978.35 cw(c0,1279.53) 0,2677.17 cw(c0,1279.53) 1210.39,1978.35 cw(c0,1279.53) 1210.39,580.71 cw(c0,1279.53) 0,-118.11 cw(c0,1279.53) -1210.39,580.71
Fabrication:
  drawing of 295 lines, arcs and shapes, not listed
  text "Layer" at 1795,1369 h60
  text "Name" at 2204.91,1369 h60
  text "Material" at 3134.66,1369 h60
  text "Thickness" at 3994.42,1369 h60
  text "Constant" at 4644.26,1369 h60
  text "Board Layer Stack" at 5214.12,1369 h60
  text "Top Overlay" at 2204.91,1249 h60
  text "Top Solder" at 2204.91,1129 h60
  text "Solder Resist" at 3134.66,1129 h60
  text "0.50mil" at 3994.42,1129 h60
  text "3.5" at 4644.26,1129 h60
  text "1" at 1795,1009 h60
  text "Top Layer" at 2204.91,1009 h60
  text "CF-005" at 3134.66,1009 h60
  text "1.70mil" at 3994.42,1009 h60
  text "Prepreg 1" at 2204.91,889 h60
  text "PP-015" at 3134.66,889 h60
  text "5.00mil" at 3994.42,889 h60
  text "4.3" at 4644.26,889 h60
  text "2" at 1795,769 h60
  text "Power" at 2204.91,769 h60
  text "CF-005" at 3134.66,769 h60
  text "1.70mil" at 3994.42,769 h60
  text "Core" at 2204.91,649 h60
  text "FR-4" at 3134.66,649 h60
  text "45.28mil" at 3994.42,649 h60
  text "4.8" at 4644.26,649 h60
  text "3" at 1795,529 h60
  text "Ground" at 2204.91,529 h60
  text "CF-005" at 3134.66,529 h60
  text "1.70mil" at 3994.42,529 h60
  text "Prepreg 2" at 2204.91,409 h60
  text "PP-015" at 3134.66,409 h60
  text "5.00mil" at 3994.42,409 h60
  text "4.3" at 4644.26,409 h60
  text "4" at 1795,289 h60
  text "Bottom Layer" at 2204.91,289 h60
  text "CF-005" at 3134.66,289 h60
  text "1.70mil" at 3994.42,289 h60
  text "Bottom Solder" at 2204.91,169 h60
  text "Solder Resist" at 3134.66,169 h60
  text "0.50mil" at 3994.42,169 h60
  text "3.5" at 4644.26,169 h60
  text "Bottom Overlay" at 2204.91,49 h60
  text "Total board thickness:" at 1795,-71 h60
  text "63.08mil" at 3994.42,-71 h60
Mechanical 13:
  circle w15: c1108.1,1919.29 r62.99
  circle w15: c1108.1,1919.29 r118.11
  circle w15: c1108.1,639.76 r62.99
  circle w15: c1108.1,639.76 r118.11
  circle w15: c0,0 r62.99
  circle w15: c0,0 r118.11
  circle w15: c0,2559.06 r62.99
  circle w15: c0,2559.06 r118.11
  circle w15: c-1108.1,1919.29 r62.99
  circle w15: c-1108.1,1919.29 r118.11
  circle w15: c-1108.1,639.76 r62.99
  circle w15: c-1108.1,639.76 r118.11
  circle w15: c-1308,1277.53 r49.21
  lines w15: -1169.09,1485.52 cw(c-1103.59,1485.52) -1038.09,1485.53 ; -1169,1074.52 -1169,1485.52 ; -1168.93,1074.52 ccw(c-1103.43,1074.52) -1037.93,1074.52 ; -1038,1074.52 -1038,1485.53
Drill Drawing:
  drawing of 179 lines, arcs and shapes, not listed
  text "Symbol" at 1836.74,4051 h72
  text "Count" at 2342.62,4051 h72
  text "Hole Size" at 2942.46,4051 h72
  text "Plated" at 4092.12,4051 h72
  text "Hole Type" at 4598,4051 h72
  text "Drill Layer Pair" at 5331.8,4051 h72
  text "Via/Pad" at 6831.35,4051 h72
  text "Pad Shape" at 7421.2,4051 h72
  text "Template" at 8167,4051 h72
  text "Hole Length" at 8846.81,4051 h72
  text "Routed Path Length" at 9936.5,4051 h72
  text "650" at 2342.62,3901 h60
  text "11.81mil (0.300mm)" at 2942.46,3901 h60
  text "PTH" at 4092.12,3901 h60
  text "Round" at 4598,3901 h60
  text "Top Layer - Bottom Layer" at 5331.8,3901 h60
  text "Via" at 6831.35,3901 h60
  text "Rounded" at 7421.2,3901 h60
  text "(Mixed)" at 8167,3901 h60
  text "-" at 8846.81,3901 h60
  text "-" at 9936.5,3901 h60
  text "1" at 2342.62,3751 h60
  text "22.84mil (0.580mm)" at 2942.46,3751 h60
  text "NPTH" at 4092.12,3751 h60
  text "Slot" at 4598,3751 h60
  text "Top Layer - Bottom Layer" at 5331.8,3751 h60
  text "Pad" at 6831.35,3751 h60
  text "Rounded" at 7421.2,3751 h60
  text "c0hn58_100" at 8167,3751 h60
  text "39.37mil (1.000mm)" at 8846.81,3751 h60
  text "16.54mil (0.420mm)" at 9936.5,3751 h60
  text "2" at 2342.62,3601 h60
  text "25.20mil (0.640mm)" at 2942.46,3601 h60
  text "NPTH" at 4092.12,3601 h60
  text "Round" at 4598,3601 h60
  text "Top Layer - Bottom Layer" at 5331.8,3601 h60
  text "Pad" at 6831.35,3601 h60
  text "Rounded" at 7421.2,3601 h60
  text "c0hn64" at 8167,3601 h60
  text "-" at 8846.81,3601 h60
  text "-" at 9936.5,3601 h60
  text "1" at 2342.62,3451 h60
  text "25.98mil (0.660mm)" at 2942.46,3451 h60
  text "NPTH" at 4092.12,3451 h60
  text "Round" at 4598,3451 h60
  text "Top Layer - Bottom Layer" at 5331.8,3451 h60
  text "Pad" at 6831.35,3451 h60
  text "Rounded" at 7421.2,3451 h60
  text "c0hn66" at 8167,3451 h60
  text "-" at 8846.81,3451 h60
  text "-" at 9936.5,3451 h60
  text "4" at 2342.62,3301 h60
  text "27.56mil (0.700mm)" at 2942.46,3301 h60
  text "PTH" at 4092.12,3301 h60
  text "Round" at 4598,3301 h60
  text "Top Layer - Bottom Layer" at 5331.8,3301 h60
  text "Pad" at 6831.35,3301 h60
  text "Rounded" at 7421.2,3301 h60
  text "c100h70" at 8167,3301 h60
  text "-" at 8846.81,3301 h60
  text "-" at 9936.5,3301 h60
  text "16" at 2342.62,3151 h60
  text "39.37mil (1.000mm)" at 2942.46,3151 h60
  text "PTH" at 4092.12,3151 h60
  text "Round" at 4598,3151 h60
  text "Top Layer - Bottom Layer" at 5331.8,3151 h60
  text "Pad" at 6831.35,3151 h60
  text "Rounded" at 7421.2,3151 h60
  text "c180h100" at 8167,3151 h60
  text "-" at 8846.81,3151 h60
  text "-" at 9936.5,3151 h60
  text "4" at 2342.62,3001 h60
  text "41.73mil (1.060mm)" at 2942.46,3001 h60
  text "PTH" at 4092.12,3001 h60
  text "Round" at 4598,3001 h60
  text "Top Layer - Bottom Layer" at 5331.8,3001 h60
  text "Pad" at 6831.35,3001 h60
  text "(Mixed)" at 7421.2,3001 h60
  text "(Mixed)" at 8167,3001 h60
  text "-" at 8846.81,3001 h60
  text "-" at 9936.5,3001 h60
  text "1" at 2342.62,2851 h60
  text "55.00mil (1.397mm)" at 2942.46,2851 h60
  text "NPTH" at 4092.12,2851 h60
  text "Round" at 4598,2851 h60
  text "Top Layer - Bottom Layer" at 5331.8,2851 h60
  text "Pad" at 6831.35,2851 h60
  text "Rounded" at 7421.2,2851 h60
  text "c0hn140" at 8167,2851 h60
  text "-" at 8846.81,2851 h60
  text "-" at 9936.5,2851 h60
  text "2" at 2342.62,2701 h60
  text "64.96mil (1.650mm)" at 2942.46,2701 h60
  text "NPTH" at 4092.12,2701 h60
  text "Round" at 4598,2701 h60
  text "Top Layer - Bottom Layer" at 5331.8,2701 h60
  text "Pad" at 6831.35,2701 h60
  text "Rounded" at 7421.2,2701 h60
  text "c0hn165" at 8167,2701 h60
  text "-" at 8846.81,2701 h60
  text "-" at 9936.5,2701 h60
  text "4" at 2342.62,2551 h60
  text "69.29mil (1.760mm)" at 2942.46,2551 h60
  text "PTH" at 4092.12,2551 h60
  text "Round" at 4598,2551 h60
  text "Top Layer - Bottom Layer" at 5331.8,2551 h60
  text "Pad" at 6831.35,2551 h60
  text "(Mixed)" at 7421.2,2551 h60
  text "(Mixed)" at 8167,2551 h60
  text "-" at 8846.81,2551 h60
  text "-" at 9936.5,2551 h60
  text "4" at 2342.62,2401 h60
  text "127.95mil (3.250mm)" at 2942.46,2401 h60
  text "NPTH" at 4092.12,2401 h60
  text "Round" at 4598,2401 h60
  text "Top Layer - Bottom Layer" at 5331.8,2401 h60
  text "Pad" at 6831.35,2401 h60
  text "Rounded" at 7421.2,2401 h60
  text "c0hn325" at 8167,2401 h60
  text "-" at 8846.81,2401 h60
  text "-" at 9936.5,2401 h60
  text "6" at 2342.62,2251 h60
  text "133.86mil (3.400mm)" at 2942.46,2251 h60
  text "NPTH" at 4092.12,2251 h60
  text "Round" at 4598,2251 h60
  text "Top Layer - Bottom Layer" at 5331.8,2251 h60
  text "Pad" at 6831.35,2251 h60
  text "Rounded" at 7421.2,2251 h60
  text "c300hn340" at 8167,2251 h60
  text "-" at 8846.81,2251 h60
  text "-" at 9936.5,2251 h60
  text "4" at 2342.62,2101 h60
  text "181.10mil (4.600mm)" at 2942.46,2101 h60
  text "PTH" at 4092.12,2101 h60
  text "Round" at 4598,2101 h60
  text "Top Layer - Bottom Layer" at 5331.8,2101 h60
  text "Pad" at 6831.35,2101 h60
  text "Rounded" at 7421.2,2101 h60
  text "c580h460" at 8167,2101 h60
  text "-" at 8846.81,2101 h60
  text "-" at 9936.5,2101 h60
  text "699 Total" at 2342.62,1951 h60
  text "Slot definitions :" at 1836.74,1806.03 h60
  text "Routed Path Length" at 2869.43,1806.03 h60
  text "= Calculated from tool start centre position to tool end centre position." at 3972.1,1806.03 h60
  text "Hole Length" at 2869.43,1706.05 h60
  text "= Routed Path Length + Tool Size = Slot length as defined in the PCB layout" at 3562.23,1706.05 h60

## Text inside footprints (layer, text, board x,y; h text height)
J1: Top Overlay "A1" at -600.35,220.27 h19.68 r90; Top Overlay "B1" at -533.35,497.27 h19.68 r90
J6: Top Overlay "PCB Edge" at 234,114.56 h19.68